# Altium PCB SBC_PCB.PcbDoc (part 2 of 4)
Units mm, origin at the board's own origin, x right, y up, seen from the top; angles counter-clockwise.
Board outline 85 x 56 mm, 8 copper layers (L1(SIG), L2(GND), L3(PWR), L4(SIG), L5(GND), L6(SIG), L7(GND), L8(SIG)), stack 1.593 mm thick; 597 components, 497 nets, 2394 pads, 229 vias.
Unrouted connection lines stored in the file: 1459.
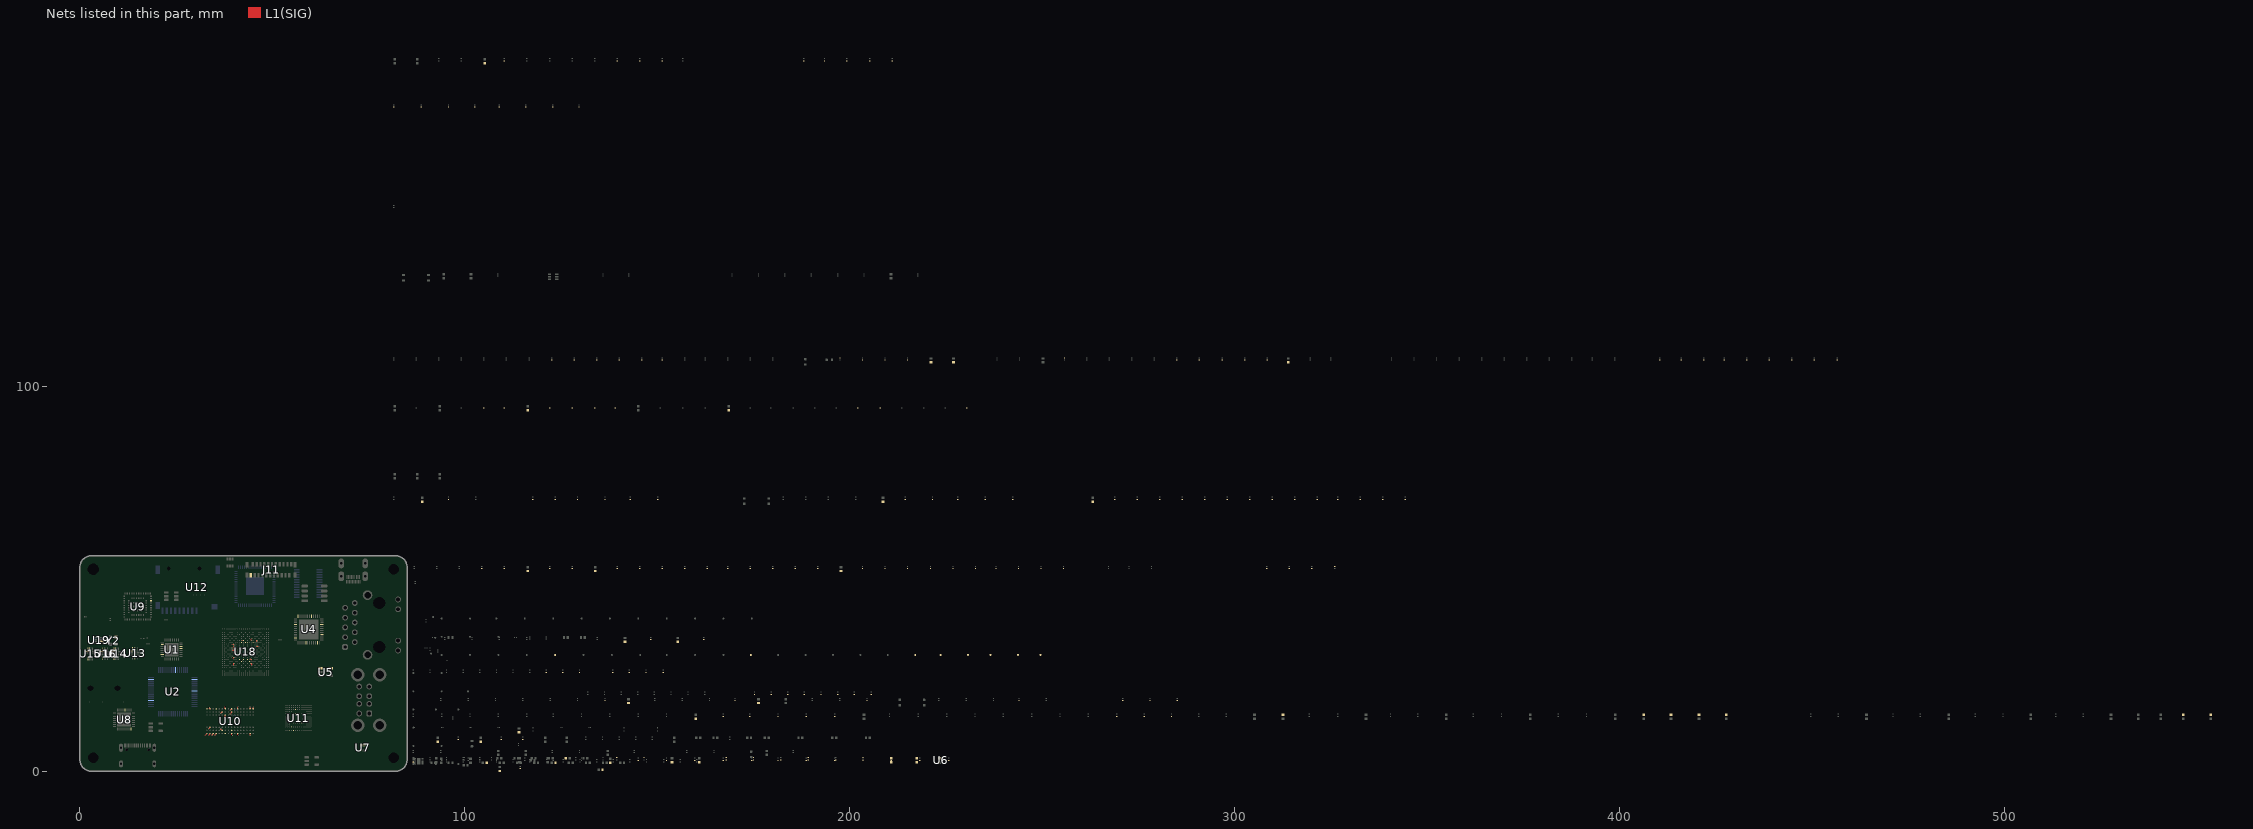
[diagram p3: the nets of this part, all layers, seen from the top]

## Footprints (in the part's own frame and the unit in brackets; to place one, negate y for a bottom-side part, rotate by r counter-clockwise, add the part's x,y. Pads: shape width x height; smd on the part's side, far side on the other; paste and mask are expansions set on the pad) (continued)
AM6254ATCGHAALW [mm]
  round 0.25 smd mask+0.05: A1(-6,6) A2(-5.5,6) A3(-5,6) A4(-4.5,6) A5(-4,6) A6(-3.5,6) A7(-3,6) A8(-2.5,6) A9(-2,6) A10(-1.5,6) A11(-1,6) A12(-0.5,6) A13(0,6) A14(0.5,6) A15(1,6) A16(1.5,6) A17(2,6) A18(2.5,6) A19(3,6) A20(3.5,6) A21(4,6) A22(4.5,6) A23(5,6) A24(5.5,6) A25(6,6) AA1(-6,-4) AA2(-5.5,-4) AA3(-5,-4) AA5(-4,-4) AA7(-3,-4) AA8(-2.5,-4) AA11(-1,-4) AA12(-0.5,-4) AA14(0.5,-4) AA15(1,-4) AA18(2.5,-4) AA19(3,-4) AA21(4,-4) AA23(5,-4) AA24(5.5,-4) AA25(6,-4) AB1(-6,-4.5) AB2(-5.5,-4.5) AB4(-4.5,-4.5) AB6(-3.5,-4.5) AB9(-2,-4.5) AB10(-1.5,-4.5) AB12(-0.5,-4.5) AB14(0.5,-4.5) AB16(1.5,-4.5) AB17(2,-4.5) AB20(3.5,-4.5) AB22(4.5,-4.5) AB24(5.5,-4.5) AB25(6,-4.5) AC1(-6,-5) AC2(-5.5,-5) AC5(-4,-5) AC6(-3.5,-5) AC9(-2,-5) AC11(-1,-5) AC13(0,-5) AC15(1,-5) AC17(2,-5) AC20(3.5,-5) AC21(4,-5) AC24(5.5,-5) AC25(6,-5) AD1(-6,-5.5) AD2(-5.5,-5.5) AD3(-5,-5.5) AD4(-4.5,-5.5) AD5(-4,-5.5) AD6(-3.5,-5.5) AD7(-3,-5.5) AD8(-2.5,-5.5) AD9(-2,-5.5) AD10(-1.5,-5.5) AD11(-1,-5.5) AD12(-0.5,-5.5) AD13(0,-5.5) AD14(0.5,-5.5) AD15(1,-5.5) AD16(1.5,-5.5) AD17(2,-5.5) AD18(2.5,-5.5) AD19(3,-5.5) AD20(3.5,-5.5) AD21(4,-5.5) AD22(4.5,-5.5) AD23(5,-5.5) AD24(5.5,-5.5) AD25(6,-5.5) AE1(-6,-6) AE2(-5.5,-6) AE3(-5,-6) AE4(-4.5,-6) AE5(-4,-6) AE6(-3.5,-6) AE7(-3,-6) AE8(-2.5,-6) AE9(-2,-6) AE10(-1.5,-6) AE11(-1,-6) AE12(-0.5,-6) AE13(0,-6) AE14(0.5,-6) AE15(1,-6) AE16(1.5,-6) AE17(2,-6) AE18(2.5,-6) AE19(3,-6) AE20(3.5,-6) AE21(4,-6) AE22(4.5,-6) AE23(5,-6) AE24(5.5,-6) AE25(6,-6) B1(-6,5.5) B2(-5.5,5.5) B3(-5,5.5) B4(-4.5,5.5) B5(-4,5.5) B6(-3.5,5.5) B7(-3,5.5) B8(-2.5,5.5) B9(-2,5.5) B10(-1.5,5.5) B11(-1,5.5) B12(-0.5,5.5) B13(0,5.5) B14(0.5,5.5) B15(1,5.5) B16(1.5,5.5) B17(2,5.5) B18(2.5,5.5) B19(3,5.5) B20(3.5,5.5) B21(4,5.5) B22(4.5,5.5) B23(5,5.5) B24(5.5,5.5) B25(6,5.5) C1(-6,5) C2(-5.5,5) C5(-4,5) C6(-3.5,5) C9(-2,5) C11(-1,5) C13(0,5) C15(1,5) C17(2,5) C20(3.5,5) C21(4,5) C24(5.5,5) C25(6,5) D1(-6,4.5) D2(-5.5,4.5) D4(-4.5,4.5) D6(-3.5,4.5) D9(-2,4.5) D10(-1.5,4.5) D12(-0.5,4.5) D14(0.5,4.5) D16(1.5,4.5) D17(2,4.5) D20(3.5,4.5) D22(4.5,4.5) D24(5.5,4.5) D25(6,4.5) E1(-6,4) E2(-5.5,4) E3(-5,4) E5(-4,4) E7(-3,4) E8(-2.5,4) E11(-1,4) E12(-0.5,4) E14(0.5,4) E15(1,4) E18(2.5,4) E19(3,4) E21(4,4) E23(5,4) E24(5.5,4) E25(6,4) F1(-6,3.5) F2(-5.5,3.5) F3(-5,3.5) F4(-4.5,3.5) F6(-3.5,3.5) F8(-2.5,3.5) F11(-1,3.5) F13(0,3.5) F15(1,3.5) F18(2.5,3.5) F20(3.5,3.5) F22(4.5,3.5) F23(5,3.5) F24(5.5,3.5) F25(6,3.5) G1(-6,3) G2(-5.5,3) G5(-4,3) G7(-3,3) G9(-2,3) G10(-1.5,3) G12(-0.5,3) G13(0,3) G14(0.5,3) G16(1.5,3) G17(2,3) G19(3,3) G21(4,3) G24(5.5,3) G25(6,3) H1(-6,2.5) H2(-5.5,2.5) H5(-4,2.5) H6(-3.5,2.5) H8(-2.5,2.5) H9(-2,2.5) H10(-1.5,2.5) H11(-1,2.5) H13(0,2.5) H15(1,2.5) H16(1.5,2.5) H17(2,2.5) H18(2.5,2.5) H20(3.5,2.5) H21(4,2.5) H24(5.5,2.5) H25(6,2.5) J1(-6,2) J2(-5.5,2) J3(-5,2) J4(-4.5,2) J7(-3,2) J8(-2.5,2) J11(-1,2) J12(-0.5,2) J13(0,2) J14(0.5,2) J18(2.5,2) J19(3,2) J22(4.5,2) J23(5,2) J24(5.5,2) J25(6,2) K1(-6,1.5) K2(-5.5,1.5) K3(-5,1.5) K4(-4.5,1.5) K7(-3,1.5) K9(-2,1.5) K10(-1.5,1.5) K13(0,1.5) K15(1,1.5) K16(1.5,1.5) K17(2,1.5) K18(2.5,1.5) K19(3,1.5) K22(4.5,1.5) K24(5.5,1.5) K25(6,1.5) L1(-6,1) L2(-5.5,1) L5(-4,1) L6(-3.5,1) L8(-2.5,1) L11(-1,1) L12(-0.5,1) L14(0.5,1) L15(1,1) L18(2.5,1) L20(3.5,1) L21(4,1) L23(5,1) L24(5.5,1) L25(6,1) M1(-6,0.5) M2(-5.5,0.5) M4(-4.5,0.5) M5(-4,0.5) M7(-3,0.5) M8(-2.5,0.5) M9(-2,0.5) M10(-1.5,0.5) M12(-0.5,0.5) M13(0,0.5) M16(1.5,0.5) M17(2,0.5) M18(2.5,0.5) M19(3,0.5) M21(4,0.5) M22(4.5,0.5) M24(5.5,0.5) M25(6,0.5) N1(-6,0) N2(-5.5,0) N3(-5,0) N6(-3.5,0) N8(-2.5,0) N11(-1,0) N12(-0.5,0) N13(0,0) N14(0.5,0) N15(1,0) N18(2.5,0) N20(3.5,0) N23(5,0) N24(5.5,0) N25(6,0) P1(-6,-0.5) P2(-5.5,-0.5) P4(-4.5,-0.5) P5(-4,-0.5) P7(-3,-0.5) P9(-2,-0.5) P10(-1.5,-0.5) P13(0,-0.5) P16(1.5,-0.5) P17(2,-0.5) P18(2.5,-0.5) P19(3,-0.5) P21(4,-0.5) P22(4.5,-0.5) P24(5.5,-0.5) P25(6,-0.5) R1(-6,-1) R2(-5.5,-1) R3(-5,-1) R5(-4,-1) R6(-3.5,-1) R8(-2.5,-1) R11(-1,-1) R12(-0.5,-1) R13(0,-1) R14(0.5,-1) R15(1,-1) R18(2.5,-1) R20(3.5,-1) R21(4,-1) R23(5,-1) R24(5.5,-1) R25(6,-1) T1(-6,-1.5) T2(-5.5,-1.5) T4(-4.5,-1.5) T7(-3,-1.5) T8(-2.5,-1.5) T9(-2,-1.5) T10(-1.5,-1.5) T13(0,-1.5) T14(0.5,-1.5) T16(1.5,-1.5) T17(2,-1.5) T18(2.5,-1.5) T19(3,-1.5) T22(4.5,-1.5) T24(5.5,-1.5) T25(6,-1.5) U1(-6,-2) U2(-5.5,-2) U3(-5,-2) U4(-4.5,-2) U7(-3,-2) U8(-2.5,-2) U11(-1,-2) U12(-0.5,-2) U14(0.5,-2) U15(1,-2) U18(2.5,-2) U19(3,-2) U22(4.5,-2) U23(5,-2) U24(5.5,-2) U25(6,-2) V1(-6,-2.5) V2(-5.5,-2.5) V5(-4,-2.5) V6(-3.5,-2.5) V8(-2.5,-2.5) V9(-2,-2.5) V10(-1.5,-2.5) V11(-1,-2.5) V13(0,-2.5) V15(1,-2.5) V16(1.5,-2.5) V17(2,-2.5) V18(2.5,-2.5) V20(3.5,-2.5) V21(4,-2.5) V24(5.5,-2.5) V25(6,-2.5) W1(-6,-3) W2(-5.5,-3) W5(-4,-3) W7(-3,-3) W9(-2,-3) W10(-1.5,-3) W12(-0.5,-3) W13(0,-3) W14(0.5,-3) W16(1.5,-3) W17(2,-3) W19(3,-3) W21(4,-3) W24(5.5,-3) W25(6,-3) Y1(-6,-3.5) Y2(-5.5,-3.5) Y3(-5,-3.5) Y4(-4.5,-3.5) Y6(-3.5,-3.5) Y8(-2.5,-3.5) Y11(-1,-3.5) Y13(0,-3.5) Y15(1,-3.5) Y18(2.5,-3.5) Y20(3.5,-3.5) Y22(4.5,-3.5) Y23(5,-3.5) Y24(5.5,-3.5) Y25(6,-3.5)
  silkscreen extent -7.1,-6.5 6.5,6.5, body extent -6.5,-6.5 6.5,6.5, height 0.89
C0201 [mm]
  rect 0.25x0.35 smd: 1(-0.275,0) 2(0.275,0)
  body extent -0.3,-0.15 0.3,0.15, height 0.3
C0402 [mm]
  rect 0.6x0.7 smd: 1(-0.5,0) 2(0.5,0)
  body extent -0.5,-0.25 0.5,0.25, height 0.5
COAXIAL-SWG [mil]
  round 1 smd mask+4: 1(0,37.4) 3(0,-37.4)
  round 1 smd mask+0: 2(-31.5,0) 4(31.5,0)
  round 1 on Top Solder: 3(0,28.94) 3(0,-28.94)
  L1(SIG) region: -45.28,-21.65 -26.77,-21.65 -17.72,-12.6 -17.72,12.6 -26.77,21.65 -45.28,21.65
  L1(SIG) region: 17.72,-12.6 26.77,-21.65 45.28,-21.65 45.28,21.65 26.77,21.65 17.72,12.6
  L1(SIG) region: -9.84,29.53 -9.84,45.28 9.84,45.28 9.84,29.53
  L1(SIG) region: -9.84,-45.28 9.84,-45.28 9.84,-29.53 -9.84,-29.53
  body extent -39,-41 39,41, height 36
D_SOD-523 [mm] "http://www.diodes.com/datasheets/ap02001.pdf p.144"
  rrect50% 0.6x0.7 smd: 1(-0.7,0) 2(0.7,0)
  silkscreen extent -1.26,-0.6 0.7,0.6, body extent -0.8,-0.4 0.8,0.4, height 0.63
D_SOD-923 [mm] "https://www.onsemi.com/pub/Collateral/ESD9B-D.PDF#page=4"
  rrect50% 0.36x0.25 smd: 1(-0.42,0) 2(0.42,0)
  silkscreen extent -0.86,-0.4 0.5,0.4, body extent -0.5,-0.3 0.5,0.3, height 0.37
ESD341 [mm]
  rrect30% 0.3x0.23 smd: 1(0,0.175) 2(0,-0.175)
  body extent -0.15,-0.3 0.15,0.3, height 0.3
FB0201 [mm]
  rect 0.25x0.35 smd: 1(-0.275,0) 2(0.275,0)
  body extent -0.3,-0.15 0.3,0.15, height 0.3
FB0402 [mm]
  rect 0.6x0.7 smd: 1(-0.5,0) 2(0.5,0)
  body extent -0.5,-0.25 0.5,0.25, height 0.5
FBGA-96_8X14MM_LAYOUT9X16_P0.8MM [mm] "FBGA-96, 8.0x14.0mm, 96 Ball, 9x16 Layout, 0.8mm Pitch, generalized from https://www.micron.com/-/media/client/global/documents/products/data-sheet/dram/ddr3/4gb_ddr3l.pdf#page=28"
  round 0.36 smd: A1(-3.2,6) A2(-2.4,6) A3(-1.6,6) A7(1.6,6) A8(2.4,6) A9(3.2,6) B1(-3.2,5.2) B2(-2.4,5.2) B3(-1.6,5.2) B7(1.6,5.2) B8(2.4,5.2) B9(3.2,5.2) C1(-3.2,4.4) C2(-2.4,4.4) C3(-1.6,4.4) C7(1.6,4.4) C8(2.4,4.4) C9(3.2,4.4) D1(-3.2,3.6) D2(-2.4,3.6) D3(-1.6,3.6) D7(1.6,3.6) D8(2.4,3.6) D9(3.2,3.6) E1(-3.2,2.8) E2(-2.4,2.8) E3(-1.6,2.8) E7(1.6,2.8) E8(2.4,2.8) E9(3.2,2.8) F1(-3.2,2) F2(-2.4,2) F3(-1.6,2) F7(1.6,2) F8(2.4,2) F9(3.2,2) G1(-3.2,1.2) G2(-2.4,1.2) G3(-1.6,1.2) G7(1.6,1.2) G8(2.4,1.2) G9(3.2,1.2) H1(-3.2,0.4) H2(-2.4,0.4) H3(-1.6,0.4) H7(1.6,0.4) H8(2.4,0.4) H9(3.2,0.4) J1(-3.2,-0.4) J2(-2.4,-0.4) J3(-1.6,-0.4) J7(1.6,-0.4) J8(2.4,-0.4) J9(3.2,-0.4) K1(-3.2,-1.2) K2(-2.4,-1.2) K3(-1.6,-1.2) K7(1.6,-1.2) K8(2.4,-1.2) K9(3.2,-1.2) L1(-3.2,-2) L2(-2.4,-2) L3(-1.6,-2) L7(1.6,-2) L8(2.4,-2) L9(3.2,-2) M1(-3.2,-2.8) M2(-2.4,-2.8) M3(-1.6,-2.8) M7(1.6,-2.8) M8(2.4,-2.8) M9(3.2,-2.8) N1(-3.2,-3.6) N2(-2.4,-3.6) N3(-1.6,-3.6) N7(1.6,-3.6) N8(2.4,-3.6) N9(3.2,-3.6) P1(-3.2,-4.4) P2(-2.4,-4.4) P3(-1.6,-4.4) P7(1.6,-4.4) P8(2.4,-4.4) P9(3.2,-4.4) R1(-3.2,-5.2) R2(-2.4,-5.2) R3(-1.6,-5.2) R7(1.6,-5.2) R8(2.4,-5.2) R9(3.2,-5.2) T1(-3.2,-6) T2(-2.4,-6) T3(-1.6,-6) T7(1.6,-6) T8(2.4,-6) T9(3.2,-6)
  silkscreen extent -5.88,6.86 -5.38,7.36, body extent -5.15,-6.65 5.15,6.65, height 1.1
HDMI_Micro-D_Molex_46765-1xxx [mm] "HDMI, Micro, Type D, THT, 0.4mm pitch, 19 ckt, right angle (http://www.molex.com/pdm_docs/sd/467651301_sd.pdf)"
  rect 0.23x0.85 smd: 1(1.8,4.775) 3(1.4,4.775) 5(1,4.775) 7(0.6,4.775) 9(0.2,4.775) 11(-0.2,4.775) 13(-0.6,4.775) 15(-1,4.775) 17(-1.4,4.775) 19(-1.8,4.775)
  rect 0.23x1 smd: 2(1.6,3.55) 4(1.2,3.55) 6(0.8,3.55) 8(0.4,3.55) 10(0,3.55) 12(-0.4,3.55) 14(-0.8,3.55) 16(-1.2,3.55) 18(-1.6,3.55)
  oval 1.5x2.55 hole 0.65 slot 1.7 at 90 deg: SH(-3.1,3.36) SH(-3.1,0) SH(3.1,3.36) SH(3.1,0)
  silkscreen extent -3.31,-2.46 3.31,5.36, body extent -3.25,-2.4 3.25,5.1, height 2.9
HR911130A [mm]
  rrect50% 1.5x1.5 hole 0.89: 1(5.716,-9.09)
  round 1.5 hole 0.89: 2(4.446,-6.55) 3(3.176,-9.09) 4(1.906,-6.55) 5(0.636,-9.09) 6(-0.634,-6.55) 7(-1.904,-9.09) 8(-3.174,-6.55) 9(-4.444,-9.09) 10(-5.714,-6.55)
  round 1.5 hole 1.02: 11(6.625,4.7) 12(4.085,4.7) 13(-4.085,4.7) 14(-6.625,4.7)
  round 0 hole 3.2 unplated: M1(-5.712,-0.2) M2(5.718,-0.2)
  round 2.5 hole 1.7: S1(-7.745,-3.25) S2(7.745,-3.25)
  body extent -8.01,-10.7 7.87,10.7, height 13.51
IS25WP128-RHLE [mil]
  round 1 smd: A2(-39.36,78.74) A3(0.01,78.74) A4(39.38,78.74) A5(78.75,78.74) B1(-78.73,39.37) B2(-39.36,39.37) B3(0.01,39.37) B4(39.38,39.37) B5(78.75,39.37) C(78.75,0) C1(-78.73,0) C2(-39.36,0) C3(0.01,0) C4(39.38,0) D1(-78.73,-39.37) D2(-39.36,-39.37) D3(0.01,-39.37) D4(39.38,-39.37) D5(78.75,-39.37) E1(-78.73,-78.74) E2(-39.36,-78.74) E3(0.01,-78.74) E4(39.38,-78.74) E5(78.75,-78.74)
  L1(SIG) region: -39.37,70.87 -42.38,71.47 -44.94,73.17 -46.64,75.73 -47.24,78.74 -47.24,78.74 -46.64,81.75 -44.94,84.31 -42.38,86.01 -39.37,86.61 -39.37,86.61 -36.36,86.01 -33.8,84.31 -32.1,81.75 -31.5,78.74 -31.5,78.74 -32.1,75.73 -33.8,73.17 -36.36,71.47 -39.37,70.87
  L1(SIG) region: 0,70.87 -3.01,71.47 -5.57,73.17 -7.27,75.73 -7.87,78.74 -7.87,78.74 -7.27,81.75 -5.57,84.31 -3.01,86.01 0,86.61 0,86.61 3.01,86.01 5.57,84.31 7.27,81.75 7.87,78.74 7.87,78.74 7.27,75.73 5.57,73.17 3.01,71.47 0,70.87
  L1(SIG) region: 39.37,70.87 36.36,71.47 33.8,73.17 32.1,75.73 31.5,78.74 31.5,78.74 32.1,81.75 33.8,84.31 36.36,86.01 39.37,86.61 39.37,86.61 42.38,86.01 44.94,84.31 46.64,81.75 47.24,78.74 47.24,78.74 46.64,75.73 44.94,73.17 42.38,71.47 39.37,70.87
  L1(SIG) region: 78.74,70.87 75.73,71.47 73.17,73.17 71.47,75.73 70.87,78.74 70.87,78.74 71.47,81.75 73.17,84.31 75.73,86.01 78.74,86.61 78.74,86.61 81.75,86.01 84.31,84.31 86.01,81.75 86.61,78.74 86.61,78.74 86.01,75.73 84.31,73.17 81.75,71.47 78.74,70.87
  L1(SIG) region: -78.74,31.5 -81.75,32.1 -84.31,33.8 -86.01,36.36 -86.61,39.37 -86.61,39.37 -86.01,42.38 -84.31,44.94 -81.75,46.64 -78.74,47.24 -78.74,47.24 -75.73,46.64 -73.17,44.94 -71.47,42.38 -70.87,39.37 -70.87,39.37 -71.47,36.36 -73.17,33.8 -75.73,32.1 -78.74,31.5
  L1(SIG) region: -39.37,31.5 -42.38,32.1 -44.94,33.8 -46.64,36.36 -47.24,39.37 -47.24,39.37 -46.64,42.38 -44.94,44.94 -42.38,46.64 -39.37,47.24 -39.37,47.24 -36.36,46.64 -33.8,44.94 -32.1,42.38 -31.5,39.37 -31.5,39.37 -32.1,36.36 -33.8,33.8 -36.36,32.1 -39.37,31.5
  L1(SIG) region: 39.37,31.5 36.36,32.1 33.8,33.8 32.1,36.36 31.5,39.37 31.5,39.37 32.1,42.38 33.8,44.94 36.36,46.64 39.37,47.24 39.37,47.24 42.38,46.64 44.94,44.94 46.64,42.38 47.24,39.37 47.24,39.37 46.64,36.36 44.94,33.8 42.38,32.1 39.37,31.5
  L1(SIG) region: 70.87,39.37 71.47,36.36 73.17,33.8 75.73,32.1 78.74,31.5 78.74,31.5 81.75,32.1 84.31,33.8 86.01,36.36 86.61,39.37 86.61,39.37 86.01,42.38 84.31,44.94 81.75,46.64 78.74,47.24 78.74,47.24 75.73,46.64 73.17,44.94 71.47,42.38 70.87,39.37
  L1(SIG) region: -78.74,-7.87 -81.75,-7.27 -84.31,-5.57 -86.01,-3.01 -86.61,0 -86.61,0 -86.01,3.01 -84.31,5.57 -81.75,7.27 -78.74,7.87 -78.74,7.87 -75.73,7.27 -73.17,5.57 -71.47,3.01 -70.87,0 -70.87,0 -71.47,-3.01 -73.17,-5.57 -75.73,-7.27 -78.74,-7.87
  L1(SIG) region: -39.37,-7.87 -42.38,-7.27 -44.94,-5.57 -46.64,-3.01 -47.24,0 -47.24,0 -46.64,3.01 -44.94,5.57 -42.38,7.27 -39.37,7.87 -39.37,7.87 -36.36,7.27 -33.8,5.57 -32.1,3.01 -31.5,0 -31.5,0 -32.1,-3.01 -33.8,-5.57 -36.36,-7.27 -39.37,-7.87
  L1(SIG) region: 0,-7.87 -3.01,-7.27 -5.57,-5.57 -7.27,-3.01 -7.87,0 -7.87,0 -7.27,3.01 -5.57,5.57 -3.01,7.27 0,7.87 0,7.87 3.01,7.27 5.57,5.57 7.27,3.01 7.87,0 7.87,0 7.27,-3.01 5.57,-5.57 3.01,-7.27 0,-7.87
  L1(SIG) region: 31.5,0 32.1,-3.01 33.8,-5.57 36.36,-7.27 39.37,-7.87 39.37,-7.87 42.38,-7.27 44.94,-5.57 46.64,-3.01 47.24,0 47.24,0 46.64,3.01 44.94,5.57 42.38,7.27 39.37,7.87 39.37,7.87 36.36,7.27 33.8,5.57 32.1,3.01 31.5,0
  L1(SIG) region: 70.87,0 71.47,-3.01 73.17,-5.57 75.73,-7.27 78.74,-7.87 78.74,-7.87 81.75,-7.27 84.31,-5.57 86.01,-3.01 86.61,0 86.61,0 86.01,3.01 84.31,5.57 81.75,7.27 78.74,7.87 78.74,7.87 75.73,7.27 73.17,5.57 71.47,3.01 70.87,0
  L1(SIG) region: -78.74,-47.24 -81.75,-46.64 -84.31,-44.94 -86.01,-42.38 -86.61,-39.37 -86.61,-39.37 -86.01,-36.36 -84.31,-33.8 -81.75,-32.1 -78.74,-31.5 -78.74,-31.5 -75.73,-32.1 -73.17,-33.8 -71.47,-36.36 -70.87,-39.37 -70.87,-39.37 -71.47,-42.38 -73.17,-44.94 -75.73,-46.64 -78.74,-47.24
  L1(SIG) region: -39.37,-47.24 -42.38,-46.64 -44.94,-44.94 -46.64,-42.38 -47.24,-39.37 -47.24,-39.37 -46.64,-36.36 -44.94,-33.8 -42.38,-32.1 -39.37,-31.5 -39.37,-31.5 -36.36,-32.1 -33.8,-33.8 -32.1,-36.36 -31.5,-39.37 -31.5,-39.37 -32.1,-42.38 -33.8,-44.94 -36.36,-46.64 -39.37,-47.24
  L1(SIG) region: -7.87,-39.37 -7.27,-42.38 -5.57,-44.94 -3.01,-46.64 0,-47.24 0,-47.24 3.01,-46.64 5.57,-44.94 7.27,-42.38 7.87,-39.37 7.87,-39.37 7.27,-36.36 5.57,-33.8 3.01,-32.1 0,-31.5 0,-31.5 -3.01,-32.1 -5.57,-33.8 -7.27,-36.36 -7.87,-39.37
  L1(SIG) region: 31.5,-39.37 32.1,-42.38 33.8,-44.94 36.36,-46.64 39.37,-47.24 39.37,-47.24 42.38,-46.64 44.94,-44.94 46.64,-42.38 47.24,-39.37 47.24,-39.37 46.64,-36.36 44.94,-33.8 42.38,-32.1 39.37,-31.5 39.37,-31.5 36.36,-32.1 33.8,-33.8 32.1,-36.36 31.5,-39.37
  L1(SIG) region: 70.87,-39.37 71.47,-42.38 73.17,-44.94 75.73,-46.64 78.74,-47.24 78.74,-47.24 81.75,-46.64 84.31,-44.94 86.01,-42.38 86.61,-39.37 86.61,-39.37 86.01,-36.36 84.31,-33.8 81.75,-32.1 78.74,-31.5 78.74,-31.5 75.73,-32.1 73.17,-33.8 71.47,-36.36 70.87,-39.37
  L1(SIG) region: -78.74,-86.61 -81.75,-86.01 -84.31,-84.31 -86.01,-81.75 -86.61,-78.74 -86.61,-78.74 -86.01,-75.73 -84.31,-73.17 -81.75,-71.47 -78.74,-70.87 -78.74,-70.87 -75.73,-71.47 -73.17,-73.17 -71.47,-75.73 -70.87,-78.74 -70.87,-78.74 -71.47,-81.75 -73.17,-84.31 -75.73,-86.01 -78.74,-86.61
  L1(SIG) region: -47.24,-78.74 -46.64,-81.75 -44.94,-84.31 -42.38,-86.01 -39.37,-86.61 -39.37,-86.61 -36.36,-86.01 -33.8,-84.31 -32.1,-81.75 -31.5,-78.74 -31.5,-78.74 -32.1,-75.73 -33.8,-73.17 -36.36,-71.47 -39.37,-70.87 -39.37,-70.87 -42.38,-71.47 -44.94,-73.17 -46.64,-75.73 -47.24,-78.74
  L1(SIG) region: -7.87,-78.74 -7.27,-81.75 -5.57,-84.31 -3.01,-86.01 0,-86.61 0,-86.61 3.01,-86.01 5.57,-84.31 7.27,-81.75 7.87,-78.74 7.87,-78.74 7.27,-75.73 5.57,-73.17 3.01,-71.47 0,-70.87 0,-70.87 -3.01,-71.47 -5.57,-73.17 -7.27,-75.73 -7.87,-78.74
  L1(SIG) region: 31.5,-78.74 32.1,-81.75 33.8,-84.31 36.36,-86.01 39.37,-86.61 39.37,-86.61 42.38,-86.01 44.94,-84.31 46.64,-81.75 47.24,-78.74 47.24,-78.74 46.64,-75.73 44.94,-73.17 42.38,-71.47 39.37,-70.87 39.37,-70.87 36.36,-71.47 33.8,-73.17 32.1,-75.73 31.5,-78.74
  L1(SIG) region: 70.87,-78.74 71.47,-81.75 73.17,-84.31 75.73,-86.01 78.74,-86.61 78.74,-86.61 81.75,-86.01 84.31,-84.31 86.01,-81.75 86.61,-78.74 86.61,-78.74 86.01,-75.73 84.31,-73.17 81.75,-71.47 78.74,-70.87 78.74,-70.87 75.73,-71.47 73.17,-73.17 71.47,-75.73 70.87,-78.74
  L1(SIG) region: 0,31.5 -3.01,32.1 -5.57,33.8 -7.27,36.36 -7.87,39.37 -7.87,39.37 -7.27,42.38 -5.57,44.94 -3.01,46.64 0,47.24 0,47.24 3.01,46.64 5.57,44.94 7.27,42.38 7.87,39.37 7.87,39.37 7.27,36.36 5.57,33.8 3.01,32.1 0,31.5
  silkscreen extent -135,125 -125,145, body extent -118,-157 118,157, height 47
LBEE5PK2AE-564 [mm]
  rect 0.3x0.45 smd: 1(-3.3,-3.375) 2(-2.7,-3.375) 3(-2.1,-3.375) 4(-1.5,-3.375) 5(-0.9,-3.375) 6(-0.3,-3.375) 7(0.3,-3.375) 8(0.9,-3.375) 9(1.5,-3.375) 10(2.1,-3.375) 11(2.7,-3.375) 12(3.3,-3.375) 23(3.3,3.375) 24(2.7,3.375) 25(2.1,3.375) 26(1.5,3.375) 27(0.9,3.375) 28(0.3,3.375) 29(-0.3,3.375) 30(-0.9,3.375) 31(-1.5,3.375) 32(-2.1,3.375) 33(-2.7,3.375) 34(-3.3,3.375) 45(-1.5,-2.175) 46(-0.9,-2.175) 47(-0.3,-2.175) 48(0.3,-2.175) 49(0.9,-2.175) 50(1.5,-2.175) 57(1.5,2.175) 58(0.9,2.175) 59(0.3,2.175) 60(-0.3,2.175) 61(-0.9,2.175) 62(-1.5,2.175) 69(-1,-1) 70(0,-1) 71(1,-1) 72(1,0) 73(1,1) 74(0,1) 75(-1,1) 76(-1,0) 77(0,0)
  rect 0.45x0.3 smd: 13(3.475,-2.7) 14(3.475,-2.1) 15(3.475,-1.5) 16(3.475,-0.9) 17(3.475,-0.3) 18(3.475,0.3) 19(3.475,0.9) 20(3.475,1.5) 21(3.475,2.1) 22(3.475,2.7) 35(-3.475,2.7) 36(-3.475,2.1) 37(-3.475,1.5) 38(-3.475,0.9) 39(-3.475,0.3) 40(-3.475,-0.3) 41(-3.475,-0.9) 42(-3.475,-1.5) 43(-3.475,-2.1) 44(-3.475,-2.7) 51(2.275,-1.5) 52(2.275,-0.9) 53(2.275,-0.3) 54(2.275,0.3) 55(2.275,0.9) 56(2.275,1.5) 63(-2.275,1.5) 64(-2.275,0.9) 65(-2.275,0.3) 66(-2.275,-0.3) 67(-2.275,-0.9) 68(-2.275,-1.5)
  silkscreen extent -4.32,-3.68 -4.06,-3.18, body extent -4,-3.9 4,3.9, height 1.19
LFBGA-153_11.5X13MM_LAYOUT14X14_P0.5MM [mm] "JEDEC eMMC AN BGA-153, 11.5x13.0mm, 153 Ball, 14x14 Layout, 0.5mm Pitch, https://www.jedec.org/sites/default/files/docs/MO-276F.pdf"
  round 0.24 smd: A1(-3.25,3.25) A2(-2.75,3.25) A3(-2.25,3.25) A4(-1.75,3.25) A5(-1.25,3.25) A6(-0.75,3.25) A7(-0.25,3.25) A8(0.25,3.25) A9(0.75,3.25) A10(1.25,3.25) A11(1.75,3.25) A12(2.25,3.25) A13(2.75,3.25) A14(3.25,3.25) B1(-3.25,2.75) B2(-2.75,2.75) B3(-2.25,2.75) B4(-1.75,2.75) B5(-1.25,2.75) B6(-0.75,2.75) B7(-0.25,2.75) B8(0.25,2.75) B9(0.75,2.75) B10(1.25,2.75) B11(1.75,2.75) B12(2.25,2.75) B13(2.75,2.75) B14(3.25,2.75) C1(-3.25,2.25) C2(-2.75,2.25) C3(-2.25,2.25) C4(-1.75,2.25) C5(-1.25,2.25) C6(-0.75,2.25) C7(-0.25,2.25) C8(0.25,2.25) C9(0.75,2.25) C10(1.25,2.25) C11(1.75,2.25) C12(2.25,2.25) C13(2.75,2.25) C14(3.25,2.25) D1(-3.25,1.75) D2(-2.75,1.75) D3(-2.25,1.75) D4(-1.75,1.75) D12(2.25,1.75) D13(2.75,1.75) D14(3.25,1.75) E1(-3.25,1.25) E2(-2.75,1.25) E3(-2.25,1.25) E5(-1.25,1.25) E6(-0.75,1.25) E7(-0.25,1.25) E8(0.25,1.25) E9(0.75,1.25) E10(1.25,1.25) E12(2.25,1.25) E13(2.75,1.25) E14(3.25,1.25) F1(-3.25,0.75) F2(-2.75,0.75) F3(-2.25,0.75) F5(-1.25,0.75) F10(1.25,0.75) F12(2.25,0.75) F13(2.75,0.75) F14(3.25,0.75) G1(-3.25,0.25) G2(-2.75,0.25) G3(-2.25,0.25) G5(-1.25,0.25) G10(1.25,0.25) G12(2.25,0.25) G13(2.75,0.25) G14(3.25,0.25) H1(-3.25,-0.25) H2(-2.75,-0.25) H3(-2.25,-0.25) H5(-1.25,-0.25) H10(1.25,-0.25) H12(2.25,-0.25) H13(2.75,-0.25) H14(3.25,-0.25) J1(-3.25,-0.75) J2(-2.75,-0.75) J3(-2.25,-0.75) J5(-1.25,-0.75) J10(1.25,-0.75) J12(2.25,-0.75) J13(2.75,-0.75) J14(3.25,-0.75) K1(-3.25,-1.25) K2(-2.75,-1.25) K3(-2.25,-1.25) K5(-1.25,-1.25) K6(-0.75,-1.25) K7(-0.25,-1.25) K8(0.25,-1.25) K9(0.75,-1.25) K10(1.25,-1.25) K12(2.25,-1.25) K13(2.75,-1.25) K14(3.25,-1.25) L1(-3.25,-1.75) L2(-2.75,-1.75) L3(-2.25,-1.75) L12(2.25,-1.75) L13(2.75,-1.75) L14(3.25,-1.75) M1(-3.25,-2.25) M2(-2.75,-2.25) M3(-2.25,-2.25) M4(-1.75,-2.25) M5(-1.25,-2.25) M6(-0.75,-2.25) M7(-0.25,-2.25) M8(0.25,-2.25) M9(0.75,-2.25) M10(1.25,-2.25) M11(1.75,-2.25) M12(2.25,-2.25) M13(2.75,-2.25) M14(3.25,-2.25) N1(-3.25,-2.75) N2(-2.75,-2.75) N3(-2.25,-2.75) N4(-1.75,-2.75) N5(-1.25,-2.75) N6(-0.75,-2.75) N7(-0.25,-2.75) N8(0.25,-2.75) N9(0.75,-2.75) N10(1.25,-2.75) N11(1.75,-2.75) N12(2.25,-2.75) N13(2.75,-2.75) N14(3.25,-2.75) P1(-3.25,-3.25) P2(-2.75,-3.25) P3(-2.25,-3.25) P4(-1.75,-3.25) P5(-1.25,-3.25) P6(-0.75,-3.25) P7(-0.25,-3.25) P8(0.25,-3.25) P9(0.75,-3.25) P10(1.25,-3.25) P11(1.75,-3.25) P12(2.25,-3.25) P13(2.75,-3.25) P14(3.25,-3.25)
  silkscreen extent -6.36,6.61 -5.86,7.11, body extent -5.75,-6.5 5.75,6.5, height 0.8
LQFP-64_10x10mm_P0.5mm [mm] "LQFP, 64 Pin (https://www.analog.com/media/en/technical-documentation/data-sheets/ad7606_7606-6_7606-4.pdf)"
  rrect50% 1.55x0.3 smd: 1(-5.675,3.75) 2(-5.675,3.25) 3(-5.675,2.75) 4(-5.675,2.25) 5(-5.675,1.75) 6(-5.675,1.25) 7(-5.675,0.75) 8(-5.675,0.25) 9(-5.675,-0.25) 10(-5.675,-0.75) 11(-5.675,-1.25) 12(-5.675,-1.75) 13(-5.675,-2.25) 14(-5.675,-2.75) 15(-5.675,-3.25) 16(-5.675,-3.75) 33(5.675,-3.75) 34(5.675,-3.25) 35(5.675,-2.75) 36(5.675,-2.25) 37(5.675,-1.75) 38(5.675,-1.25) 39(5.675,-0.75) 40(5.675,-0.25) 41(5.675,0.25) 42(5.675,0.75) 43(5.675,1.25) 44(5.675,1.75) 45(5.675,2.25) 46(5.675,2.75) 47(5.675,3.25) 48(5.675,3.75)
  rrect50% 0.3x1.55 smd: 17(-3.75,-5.675) 18(-3.25,-5.675) 19(-2.75,-5.675) 20(-2.25,-5.675) 21(-1.75,-5.675) 22(-1.25,-5.675) 23(-0.75,-5.675) 24(-0.25,-5.675) 25(0.25,-5.675) 26(0.75,-5.675) 27(1.25,-5.675) 28(1.75,-5.675) 29(2.25,-5.675) 30(2.75,-5.675) 31(3.25,-5.675) 32(3.75,-5.675) 49(3.75,5.675) 50(3.25,5.675) 51(2.75,5.675) 52(2.25,5.675) 53(1.75,5.675) 54(1.25,5.675) 55(0.75,5.675) 56(0.25,5.675) 57(-0.25,5.675) 58(-0.75,5.675) 59(-1.25,5.675) 60(-1.75,5.675) 61(-2.25,5.675) 62(-2.75,5.675) 63(-3.25,5.675) 64(-3.75,5.675)
  silkscreen extent -6.09,-5.11 5.11,5.11, body extent -6,-6 6,6, height 1.5
MSD-1-A [mm]
  rect 0.6x1.6 smd: 1(2.325,7.825) 2(1.225,7.825) 3(0.125,7.825) 4(-0.975,7.825) 5(-2.075,7.825) 6(-3.175,7.825) 7(-4.275,7.825) 8(-5.375,7.825) 9(-6.475,7.825)
  round 0 hole 1 unplated: 14(-4.874,-3.175) 15(3.126,-3.175)
  rect 1.2x2.2 smd: SH(-7.675,-2.775) SH(7.825,-2.775)
  rect 1.2x1.8 smd: SH(-7.675,6.525)
  rect 1.6x1.5 smd: SH(7.025,6.775)
  silkscreen extent 3.56,8.13 3.81,8.64, body extent -7.95,-7.3 8.2,7.75, height 1.86
OSCILLATOR_SMD_ECS_2520MV-XXX-XX-4PIN_2.5X2.0MM [mm] "Miniature Crystal Clock Oscillator ECS 2520MV series, https://www.ecsxtal.com/store/pdf/ECS-2520MV.pdf"
  rrect50% 0.8x0.9 smd: 1(-0.725,0.925) 2(-0.725,-0.925) 3(0.725,-0.925) 4(0.725,0.925)
  silkscreen extent -1.11,-1.36 1.11,1.56, body extent -1,-1.25 1,1.25, height 0.91
PJ-342 [mm]
  round 0.025 smd: 2(2.2,3.6) 3(9.5,3.6) 4(11.5,3.3) 5(2.2,-3.6) 6(5.5,-3.6) 7(11,-3.6)
  round 0 hole 1.5 unplated: 3(2.4,0) 5(9.4,0)
  L1(SIG) region: 1.45,2.6 2.95,2.6 2.95,4.6 1.45,4.6
  L1(SIG) region: 10.75,2 10.75,4.6 12.25,4.6 12.25,2
  L1(SIG) region: 8.75,2.6 8.75,4.6 10.25,4.6 10.25,2.6
  L1(SIG) region: 1.45,-4.6 1.45,-2.6 2.95,-2.6 2.95,-4.6
  L1(SIG) region: 4.75,-4.6 4.75,-2.6 6.25,-2.6 6.25,-4.6
  L1(SIG) region: 10.25,-4.6 11.75,-4.6 11.75,-2.6 10.25,-2.6
  body extent -2,-4.25 12.3,4.25, height 4.81
QFN-32-1EP_5X5MM_P0.5MM_EP3.7X3.7MM [mm] "QFN, 32 Pin (https://www.espressif.com/sites/default/files/documentation/0a-esp8285_datasheet_en.pdf)"
  rrect50% 0.8x0.25 smd: 1(-2.45,1.75) 2(-2.45,1.25) 3(-2.45,0.75) 4(-2.45,0.25) 5(-2.45,-0.25) 6(-2.45,-0.75) 7(-2.45,-1.25) 8(-2.45,-1.75) 17(2.45,-1.75) 18(2.45,-1.25) 19(2.45,-0.75) 20(2.45,-0.25) 21(2.45,0.25) 22(2.45,0.75) 23(2.45,1.25) 24(2.45,1.75)
  rrect50% 0.25x0.8 smd: 9(-1.75,-2.45) 10(-1.25,-2.45) 11(-0.75,-2.45) 12(-0.25,-2.45) 13(0.25,-2.45) 14(0.75,-2.45) 15(1.25,-2.45) 16(1.75,-2.45) 25(1.75,2.45) 26(1.25,2.45) 27(0.75,2.45) 28(0.25,2.45) 29(-0.25,2.45) 30(-0.75,2.45) 31(-1.25,2.45) 32(-1.75,2.45)
  rect 3.7x3.7 smd paste-1.85: 33(0,0)
  silkscreen extent -3.44,-2.61 2.61,2.61, body extent -2.5,-2.5 2.5,2.5, height 0.85
QFN-48-1EP_7X7MM_P0.5MM_EP5.15X5.15MM [mm] "QFN, 48 Pin (http://www.analog.com/media/en/package-pcb-resources/package/pkg_pdf/ltc-legacy-qfn/QFN_48_05-08-1704.pdf)"
  rrect50% 0.875x0.25 smd: 1(-3.437,2.75) 2(-3.437,2.25) 3(-3.438,1.75) 4(-3.438,1.25) 5(-3.437,0.75) 6(-3.437,0.25) 7(-3.437,-0.25) 8(-3.437,-0.75) 9(-3.438,-1.25) 10(-3.438,-1.75) 11(-3.437,-2.25) 12(-3.437,-2.75) 25(3.437,-2.75) 26(3.437,-2.25) 27(3.438,-1.75) 28(3.438,-1.25) 29(3.437,-0.75) 30(3.437,-0.25) 31(3.437,0.25) 32(3.437,0.75) 33(3.438,1.25) 34(3.438,1.75) 35(3.437,2.25) 36(3.437,2.75)
  rrect50% 0.25x0.875 smd: 13(-2.75,-3.437) 14(-2.25,-3.437) 15(-1.75,-3.438) 16(-1.25,-3.438) 17(-0.75,-3.437) 18(-0.25,-3.437) 19(0.25,-3.437) 20(0.75,-3.437) 21(1.25,-3.438) 22(1.75,-3.438) 23(2.25,-3.437) 24(2.75,-3.437) 37(2.75,3.437) 38(2.25,3.437) 39(1.75,3.438) 40(1.25,3.438) 41(0.75,3.437) 42(0.25,3.437) 43(-0.25,3.437) 44(-0.75,3.437) 45(-1.25,3.438) 46(-1.75,3.438) 47(-2.25,3.437) 48(-2.75,3.437)
  rect 5.15x5.15 smd paste-2.575: 49(0,0)
  silkscreen extent -4.47,-3.61 3.61,3.61, body extent -3.55,-3.55 3.55,3.55, height 1
QFN-72-1EP_10X10MM_P0.5MM_EP4.7X4.7MM [mm] "QFN, 72 Pin (http://ww1.microchip.com/downloads/en/DeviceDoc/00001682C.pdf#page=70)"
  rrect50% 0.875x0.25 smd: 1(-4.938,4.25) 2(-4.938,3.75) 3(-4.938,3.25) 4(-4.938,2.75) 5(-4.938,2.25) 6(-4.938,1.75) 7(-4.938,1.25) 8(-4.938,0.75) 9(-4.938,0.25) 10(-4.938,-0.25) 11(-4.938,-0.75) 12(-4.938,-1.25) 13(-4.938,-1.75) 14(-4.938,-2.25) 15(-4.938,-2.75) 16(-4.938,-3.25) 17(-4.938,-3.75) 18(-4.938,-4.25) 37(4.938,-4.25) 38(4.938,-3.75) 39(4.938,-3.25) 40(4.938,-2.75) 41(4.938,-2.25) 42(4.938,-1.75) 43(4.938,-1.25) 44(4.938,-0.75) 45(4.938,-0.25) 46(4.938,0.25) 47(4.938,0.75) 48(4.938,1.25) 49(4.938,1.75) 50(4.938,2.25) 51(4.938,2.75) 52(4.938,3.25) 53(4.938,3.75) 54(4.938,4.25)
  rrect50% 0.25x0.875 smd: 19(-4.25,-4.938) 20(-3.75,-4.938) 21(-3.25,-4.938) 22(-2.75,-4.938) 23(-2.25,-4.938) 24(-1.75,-4.938) 25(-1.25,-4.938) 26(-0.75,-4.938) 27(-0.25,-4.938) 28(0.25,-4.938) 29(0.75,-4.938) 30(1.25,-4.938) 31(1.75,-4.938) 32(2.25,-4.938) 33(2.75,-4.938) 34(3.25,-4.938) 35(3.75,-4.938) 36(4.25,-4.938) 55(4.25,4.938) 56(3.75,4.938) 57(3.25,4.938) 58(2.75,4.938) 59(2.25,4.938) 60(1.75,4.938) 61(1.25,4.938) 62(0.75,4.938) 63(0.25,4.938) 64(-0.25,4.938) 65(-0.75,4.938) 66(-1.25,4.938) 67(-1.75,4.938) 68(-2.25,4.938) 69(-2.75,4.938) 70(-3.25,4.938) 71(-3.75,4.938) 72(-4.25,4.938)
  rect 4.7x4.7 smd paste-3: 73(0,0)
  silkscreen extent -5.35,-5.11 5.11,5.44, body extent -5,-5 5,5, height 0.85
R0201 [mm]
  rect 0.25x0.35 smd: 1(-0.275,0) 2(0.275,0)
  body extent -0.3,-0.15 0.3,0.15, height 0.23
R0402 [mm]
  rect 0.6x0.7 smd: 1(-0.5,0) 2(0.5,0)
  body extent -0.5,-0.25 0.5,0.25, height 0.35
SOT563 [mm]
  rect 0.3x0.67 smd: 1(-0.5,-0.635) 2(0,-0.635) 3(0.5,-0.635) 4(0.5,0.635) 5(0,0.635) 6(-0.5,0.635)
  body extent -0.8,-0.81 0.8,0.81, height 0.6
SOT-23-5 [mm] "TI SOT-23-5"
  rrect16% 1.1x0.6 smd: 1(-1.3,0.95) 2(-1.3,0) 3(-1.3,-0.95) 4(1.3,-0.95) 5(1.3,0.95)
  silkscreen extent -1.52,1.52 -1.02,1.78, body extent -1.4,-1.45 1.4,1.45, height 1.2
SOT-23-6 [mm] "TI SOT-23-6"
  rrect16% 1.1x0.6 smd: 1(-1.3,0.95) 2(-1.3,0) 3(-1.3,-0.95) 4(1.3,-0.95) 5(1.3,0) 6(1.3,0.95)
  silkscreen extent -1.52,1.52 -1.02,1.78, body extent -1.4,-1.45 1.4,1.45, height 1.45
SW_DIP_SPSTx04_Slide [mm] "SMD 4x-dip-switch SPST P1.27mm"
  rrect50% 1.6x0.76 smd: 1(-2.54,1.905) 2(-2.54,0.635) 3(-2.54,-0.635) 4(-2.54,-1.905) 5(2.54,-1.905) 6(2.54,-0.635) 7(2.54,0.635) 8(2.54,1.905)
  silkscreen extent -3.34,-3.23 2.76,3.23, body extent -2.8,-3.16 2.8,3.16, height 2.65
TDFN-8-2x2mm_P0.5mm [mm]
  rrect50% 1.05x0.3 smd: 1(-0.85,0.75)
  rrect50% 0.95x0.3 smd: 2(-0.9,0.25) 3(-0.9,-0.25) 4(-0.9,-0.75) 5(0.9,-0.75) 6(0.9,-0.25) 7(0.9,0.25) 8(0.9,0.75)
  silkscreen extent -1.04,1.21 -0.76,1.4, body extent -1,-1 1,1, height 0.75
TP_0.50mm [mm] "Testpoint 0.50mm diameter"
  round 0.5 smd paste-1: TP(0,0)
  body extent -0.2,-0.2 0.2,0.2, height 0.1
TPESD05R4C6 [mm]
  rect 0.4x0.85 smd: 1(-0.65,-0.925) 2(0,-0.925) 3(0.65,-0.925) 4(0.65,0.925) 5(0,0.925) 6(-0.65,0.925)
  silkscreen extent -1.4,-1.27 -1.14,-0.76, body extent -1,-1.05 1,1.05, height 1.1
TPS259531 [mm]
  rrect40% 0.5x0.25 smd: 1(-0.95,0.75) 2(-0.95,0.25) 3(-0.95,-0.25) 4(-0.95,-0.75) 5(0.95,-0.75) 6(0.95,-0.25) 7(0.95,0.25) 8(0.95,0.75)
  rrect11% 0.9x1.6 smd: 9(0,0)
  silkscreen extent -1.65,0.51 -1.4,1.02, body extent -1,-1 1,1, height 0.77
TSOP65P640X120-24N [mm] "TSOP, 24-Leads, Body 7.80x4.40mm, Pitch 0.65mm, IPC Medium Density"
  rrect22% 1.5x0.45 smd: 1(-2.95,3.575) 2(-2.95,2.925) 3(-2.95,2.275) 4(-2.95,1.625) 5(-2.95,0.975) 6(-2.95,0.325) 7(-2.95,-0.325) 8(-2.95,-0.975) 9(-2.95,-1.625) 10(-2.95,-2.275) 11(-2.95,-2.925) 12(-2.95,-3.575) 13(2.95,-3.575) 14(2.95,-2.925) 15(2.95,-2.275) 16(2.95,-1.625) 17(2.95,-0.975) 18(2.95,-0.325) 19(2.95,0.325) 20(2.95,0.975) 21(2.95,1.625) 22(2.95,2.275) 23(2.95,2.925) 24(2.95,3.575)
  silkscreen extent -3.05,-3.95 1.85,4.44, body extent -3.2,-3.9 3.2,3.9, height 1.13
UQFN-16_1.8x2.6mm_P0.4mm [mm] "UQFN, 16 Pin (https://www.ti.com/lit/ml/qfnd836/qfnd836.pdf)"
  rrect50% 0.9x0.2 smd: 1(-0.8,0.6)
  rrect50% 0.8x0.2 smd: 2(-0.85,0.2) 3(-0.85,-0.2) 4(-0.85,-0.6) 9(0.85,-0.6) 10(0.85,-0.2) 11(0.85,0.2) 12(0.85,0.6)
  rrect50% 0.2x0.8 smd: 5(-0.6,-1.25) 6(-0.2,-1.25) 7(0.2,-1.25) 8(0.6,-1.25) 13(0.6,1.25) 14(0.2,1.25) 15(-0.2,1.25) 16(-0.6,1.25)
  silkscreen extent -1.3,-1.41 1.01,1.41, body extent -0.9,-1.3 0.9,1.3, height 0.55
USB_A_CUI_UJ2-ADH-TH_Horizontal_Stacked [mm] "USB-A two stacked horizontal receptacle, through-hole (https://www.cuidevices.com/product/resource/uj2-adh-th.pdf)"
  rrect33% 1.5x1.5 hole 0.92: 1(0,0)
  round 1.5 hole 0.92: 2(0,-2.5) 3(0,-4.5) 4(0,-7) 5(2.62,0) 6(2.62,-2.5) 7(2.62,-4.5) 8(2.62,-7)
  round 3.5 hole 2.3: SH(-2.71,3.07) SH(-2.71,-10.07) SH(2.97,3.07) SH(2.97,-10.07)
  silkscreen extent -11.58,-10.13 4.07,3.75, body extent -13.03,-11.58 4.06,4.47, height 16.18
USB_C_Receptacle_GCT_USB4105-xx-A_16P_TopMnt_Horizontal [mm] "USB 2.0 Type C Receptacle, GCT, 16P, top mounted, horizontal, 5A: https://gct.co/files/drawings/usb4105.pdf"
  rrect50% 0.6x1.15 smd: A1(-3.2,3.68) A4(-2.4,3.68) A9(2.4,3.68) A12(3.2,3.68) B1(3.2,3.68) B4(2.4,3.68) B9(-2.4,3.68) B12(-3.2,3.68)
  rrect50% 0.3x1.15 smd: A5(-1.25,3.68) A6(-0.25,3.68) A7(0.25,3.68) A8(1.25,3.68) B5(1.75,3.68) B6(0.75,3.68) B7(-0.75,3.68) B8(-1.75,3.68)
  oval 1x1.8 hole 0.6 slot 1.4 at 90 deg: S1(-4.32,-1.075) S1(4.32,-1.075)
  oval 1x2.1 hole 0.6 slot 1.7 at 90 deg: S1(-4.32,3.105) S1(4.32,3.105)
  round 0.65 hole 0.65 unplated: ""(-2.89,2.605) ""(2.89,2.605)
  silkscreen extent -4.67,0.1 4.67,1.8, body extent -4.47,-3.52 4.47,4.19, height 3.32
VQFN-32-1EP_5X5MM_P0.5MM_EP3.5X3.5MM [mm] "VQFN, 32 Pin (https://www.ftdichip.com/Support/Documents/DataSheets/ICs/DS_FT4222H.pdf#page=40)"
  rrect50% 0.8x0.25 smd: 1(-2.45,1.75) 2(-2.45,1.25) 3(-2.45,0.75) 4(-2.45,0.25) 5(-2.45,-0.25) 6(-2.45,-0.75) 7(-2.45,-1.25) 8(-2.45,-1.75) 17(2.45,-1.75) 18(2.45,-1.25) 19(2.45,-0.75) 20(2.45,-0.25) 21(2.45,0.25) 22(2.45,0.75) 23(2.45,1.25) 24(2.45,1.75)
  rrect50% 0.25x0.8 smd: 9(-1.75,-2.45) 10(-1.25,-2.45) 11(-0.75,-2.45) 12(-0.25,-2.45) 13(0.25,-2.45) 14(0.75,-2.45) 15(1.25,-2.45) 16(1.75,-2.45) 25(1.75,2.45) 26(1.25,2.45) 27(0.75,2.45) 28(0.25,2.45) 29(-0.25,2.45) 30(-0.75,2.45) 31(-1.25,2.45) 32(-1.75,2.45)
  rect 3.5x3.5 smd paste-1.75: 33(0,0)
  silkscreen extent -3.44,-2.61 2.61,2.61, body extent -2.5,-2.5 2.5,2.5, height 0.8

## Part data
AE1: "Ceramic chip antenna with pin for PCB trace"
C1 C2 C3 C4 C7 C8 C9 C10 C11 C12 C13 C16 C18 C42 C45 C49 C50 C83 C86 C88 C90 C101 C112 C119 C124 C131 C141 C143 C144 C147 C150 C153 C156 C157 C177 C180 C183 C186 C192 C193 C202 C215 C222 C224 C238 C240 C242 C243 C246 C250 C257 C258 C259 C261 C263 C266 C267: library part C_0402, "MLCC 0402"
C14 C15 C17 C19 C20 C21 C22 C25 C26 C27 C29 C30 C31 C32 C34 C36 C37 C38 C39 C40 C41 C43 C44 C46 C47 C48 C51 C52 C53 C54 C82 C84 C85 C87 C89 C91 C92 C93 C94 C95 C96 C97 C98 C99 C100 C102 C103 C104 C105 C106 C107 C108 C109 C110 C111 C113 C114 C115 C116 C117 C118 C120 C121 C122 C123 C125 C126 C127 C128 C129 C130 C132 C133 C134 C135 C136 C137 C138 C139 C140 C142 C145 C146 C148 C149 C151 C152 C154 C155 C158 C159 C160 C161 C162 C163 C164 C165 C166 C167 C168 C169 C170 C171 C172 C173 C174 C175 C176 C178 C179 C181 C182 C184 C185 C187 C188 C189 C190 C191 C194 C195 C196 C197 C198 C199 C200 C201 C203 C204 C205 C206 C207 C208 C209 C210 C211 C212 C213 C214 C216 C217 C218 C219 C220 C221 C223 C225 C226 C227 C228 C229 C230 C231 C232 C233 C234 C235 C236 C237 C239 C241 C244 C245 C247 C248 C249 C251 C252 C253 C254 C255 C256: "MLCC 0201"
C23 C24 C28 C33 C35 C55 C56 C59 C62 C67 C69 C71 C72 C73 C74 C75 C76 C77 C78 C79 C80 C81 C264 C265 C268: "MLCC 0402"
D1 D2: "Diode, filled shape", Sim.Device=D, Sim.Pins="1=K 2=A"
D3 D4 D5 D6 D7 D8: "Diode, filled shape", Manufacturer Part Number=BAT54TS_R1_00001, Manufacturer_Name="Panjit International Inc."
D9 D10: library part D_Zener, "Diode, filled shape", Manufacturer Part Number=BAT54TS_R1_00001, Manufacturer_Name="Panjit International Inc."
ESD1 ESD2: "ESD and Surge Protection (TVS/ESD) 1.3pF 5V 5uA 6.5A@8/20us 9V 9V Four channels SOT-363  ROHS", Manufacturer_Name="TECH PUBLIC", Manufacturer_Part_Number=TPESD05R4C6
ESD3: "HDMI TSSOP-24 Interface 3.4Gbps 4.5V~5.5V I2C", Manufacturer_Name="Texas Instrument", Manufacturer_Part_Number=TPD12S016PWR
ESD4 ESD5 ESD8: library part D_ESDU, "ESD diode uni-directional", Manufacturer Part Number=DF2S8.2FS,L3M, Manufacturer_Name=TOSHIBA
ESD6 ESD7 ESD9 ESD10 ESD11 ESD12: library part D_ESDB, "ESD diode bi-directional", Manufacturer Part Number=ESD341DPLR, Manufacturer_Name="TECH PUBLIC"
FB3 FB4 FB5 FB6 FB7 FB8 FB9 FB10 FB11 FB12 FB13 FB14 FB15 FB16: "Ferrite bead"
J4: library part PJ-342, "3.5mm Headphone Jack 30V 500mA Copper Gold SMD Audio Connectors ROHS", Manufacturer_Name="SHOU HAN", Manufacturer_Part_Number=PJ-342
J6: "1 port RJ45 MagJack GIGABIT Right Angle Shielded With Contact Spring With LED", Manufacturer_Name="HANRUN(Zhongshan HanRun Elec)", Manufacturer_Part_Number=HR915350C, Height=13.55
J7: "SWG Connector Receptacle, Female Socket 50 Ohms Surface Mount Solder"
J8: "Micro SD Card Socket with one card detection pin", Manufacturer_Name=CUI, ComponentLink1Description=Datasheet, ComponentLink1URL=https://datasheet.lcsc.com/lcsc/2110151630_XKB-Connectivity-XKTF-015-N_C381082.pdf, Manufacturer_Part_Number=MSD-1-A
J10: "HDMI 1.4+ type D connector", ComponentLink1Description=Datasheet, ComponentLink1URL=http://pinoutguide.com/PortableDevices/micro_hdmi_type_d_pinout.shtml, Datasheet=http://pinoutguide.com/PortableDevices/micro_hdmi_type_d_pinout.shtml
J11: "Generic connector, single row, 01x22, script generated (kicad-library-utils/schlib/autogen/connector/)"
J12: "USB 2.0-only 16P Type-C Receptacle connector", Manufacturer_Name=GCT, Manufacturer_Part_Number=USB4105-GF-A, ComponentLink1Description=Datasheet, ComponentLink1URL=https://www.usb.org/sites/default/files/documents/usb_type-c.zip, Datasheet=https://www.usb.org/sites/default/files/documents/usb_type-c.zip
J13: "USB Type A connector, stacked", Manufacturer_Name="SHOU HAN", Manufacturer_Part_Number="AF SS-JB17.6"
L6 L7: library part L_0201, "Inductor"
R1 R2 R3 R4 R5 R6 R7 R8 R9 R10 R11 R12 R13 R14 R15 R16 R17 R18 R19 R20 R21 R22 R23 R24 R25 R26 R27 R28 R29 R30 R31 R32 R33 R34 R35 R36 R37 R38 R39 R40 R41 R42 R43 R44 R45 R46 R47 R48 R49 R50 R51 R52 R53 R54 R55 R56 R57 R58 R59 R63 R64 R65 R66 R67 R68 R69 R70 R78 R79 R80 R81 R82 R83 R84 R85 R86 R87 R88 R89 R90 R91 R92 R93 R94 R95 R96 R97 R98 R99 R100 R101 R102 R103 R104 R105 R106 R107 R108 R109 R110 R111 R112 R113 R114 R115 R116 R117 R118 R119 R120 R121 R122 R123 R124 R125 R126 R127 R128 R129 R130 R131 R132 R133 R134 R135 R136 R137 R138 R139 R140 R141 R142 R143 R144 R145 R146 R147 R148 R149 R150 R151 R152 R153 R154 R155 R156 R157 R158 R159 R160 R161 R162 R163 R164 R165 R166 R167 R168 R169 R170 R171 R172 R173 R174 R175 R176 R177 R178 R179 R180 R181 R182 R183 R184 R185 R186 R187 R188 R189 R191 R192 R193 R194 R196 R197 R198 R199 R200 R201 R202 R203 R204 R205 R206 R207 R208 R209 R210 R211 R212 R213 R214 R215: library part R_0201, Tolerance=1%
R60 R61 R62 R71 R72 R73 R74 R75 R76 R77 R190 R195: library part R_0402, Tolerance=1%
SW2: library part SW_DIP_4, Manufacturer_Name="CTS Electrocomponents", Manufacturer_Part_Number=218-4LPSTJR
U1: "Audio CODEC 24 b I2S, PCM", ComponentLink1Description=Datasheet, ComponentLink1URL=https://datasheetspdf.com/pdf-file/1134755/nuvoton/NAU88C22/1, Datasheet=https://datasheetspdf.com/pdf-file/1134755/nuvoton/NAU88C22/1
U2: "Hi Speed Quad Channel USB UART/FIFO, LQFP/QFN-64", ComponentLink1Description=Datasheet, ComponentLink1URL=https://www.ftdichip.com/Support/Documents/DataSheets/ICs/DS_FT4232H.pdf, Datasheet=https://www.ftdichip.com/Support/Documents/DataSheets/ICs/DS_FT4232H.pdf
U4: "Gigabit Ethernet Transceiver with RGMII Interface and IEEE 1588v2 Support, VQFN-48", ComponentLink1Description=Datasheet, ComponentLink1URL=https://ww1.microchip.com/downloads/aemDocuments/documents/UNG/ProductDocuments/DataSheets/LAN8840-Data-Sheet-DS00004727.pdf, Datasheet=https://ww1.microchip.com/downloads/aemDocuments/documents/UNG/ProductDocuments/DataSheets/LAN8840-Data-Sheet-DS00004727.pdf, KiCad_Footprint=Package_DFN_QFN:QFN-48-1EP_7x7mm_P0.5mm_EP5.15x5.15mm
U5: "Linear Voltage Regulator IC Positive Fixed 1 Output 300mA SOT-23-5", Manufacturer_Name="Texas Instruments", Manufacturer_Part_Number=TLV74311PDBVR
U6 U7: "Buck Switching Regulator IC Positive Adjustable 0.6V 1 Output 3A SOT-563", Manufacturer_Name="Diodes Incorporated", Manufacturer_Part_Number=AP61300Z6-7
U8: library part TPS6521901RSMR, "PMIC, 3 bucks + 4 LDOs, I2C, NVM 07, 4x4mm RHB VQFN-32 plus exposed PGND pad 33", ComponentLink1Description=Datasheet, ComponentLink1URL=https://www.ti.com/lit/ds/symlink/tps65219.pdf, Datasheet=https://www.ti.com/lit/ds/symlink/tps65219.pdf, Footprint_Note="Generic footprint candidate: 5x5mm, 0.5mm pitch, EP3.7mm. Exists locally; pad lengths differ from TI RHB0032W recommended land pattern. Review before PCB fabrication.", MPN=TPS6521901RSMR
U9: "Murata Type 2AE Wi-Fi 802.11a/b/g/n/ac + Bluetooth 5.2 combo module, Infineon CYW4373E, SDIO/USB host interface, 8.0x7.8mm LGA-77", ComponentLink1Description=Datasheet, ComponentLink1URL=https://www.murata.com/products/productdata/8816428220446/type2ae.pdf, Datasheet=https://www.murata.com/products/productdata/8816428220446/type2ae.pdf, KiCad_Footprint=RF_Module:Murata_LBEE5PK2AE-564
U10: "1G x 16-bit (16 Gbit) CMOS Double Data Rate IV Synchronous RAM, FBGA-96", ComponentLink1Description=Datasheet, ComponentLink1URL=https://www.alldatasheet.com/datasheet-pdf/pdf/1643784/SAMSUNG/K4AAG165WA-BCWE.html, Datasheet=https://www.alldatasheet.com/datasheet-pdf/pdf/1643784/SAMSUNG/K4AAG165WA-BCWE.html, KiCad_Footprint=Package_BGA:Samsung_FBGA-96_8x14mm_Layout9x16_P0.8mm
U11: "Samsung eMMC 5.1, 32GB, NAND flash + MMC controller, HS400 capable, FBGA-153", ComponentLink1Description=Datasheet, ComponentLink1URL=https://www.lcsc.com/datasheet/C2803245.pdf, Datasheet=https://www.lcsc.com/datasheet/C2803245.pdf, KiCad_Footprint=Package_BGA:Samsung_FBGA-153_11.5x13mm_Layout14x14_P0.5mm
U12: "128Mbit 1.65V~1.95V 133MHz SPI TFBGA-24(6x8) Memory RoHS"
U13 U14 U15 U16: "4-Bit Dual-Supply Bus Transceiver With Configurable Voltage Translation and 3-State Outputs, 16-UQFN (2.6x1.8)", Manufacturer_Name="Texas Instruments", Datasheet=https://www.ti.com/lit/ds/symlink/sn74axc4t774.pdf?HQS=dis-dk-null-digikeymode-dsf-pf-null-wwe&ts=1791191909639&ref_url=https%253A%252F%252Fwww.ti.com%252Fgeneral%252Fdocs%252Fsuppproductinfo.tsp%253FdistId%253D10%2526gotoUrl%253Dhttps%253A%252F%252Fwww.ti.com%252Flit%252Fgpn%252Fsn74axc4t774, Manufacturer_Part_Number=SN74AXC4T774RSVR
U17: "Load Switch -40℃~+105℃ 1 1V~5.5V 2A 53mΩ Active High SOT-23-6 Power Distribution Switches ROHS", Manufacturer_Name="Texas Instruments", Manufacturer_Part_Number=TPS22918DBVR
U18: "TI AM6254, quad Cortex-A53 SoC, ALW 425-ball FCCSP 13x13mm 0.5mm pitch; separate interface and power units", ComponentLink1Description=Datasheet, ComponentLink1URL=https://www.ti.com/lit/ds/symlink/am625.pdf, Datasheet=https://www.ti.com/lit/ds/symlink/am625.pdf, Footprint_Note="Unassigned: requires verified ALW0425 425-ball FCCSP, 13x13mm, 0.5mm pitch; do not substitute a fully populated BGA.", KiCad_Footprint=SamacSys_Parts:BGA425C50P25X25_1300X1300X89, MPN=AM6254ATCGHAALW, Pinmux_Note="Each physical ball occurs once under its primary interface. See companion pinmux CSV for alternate functions. Multiplexable digital pads use bidirectional ERC type."
U19: "Clock Clock Buffer IC 1:4 250 MHz 8-WFDFN Exposed Pad"
U20: "HDMI 1.4 transmitter with 24-bit parallel video", Manufacturer_Name=Lattice, Manufacturer_Part_Number=SiI9022ACNU
U21 U22: "Linear Voltage Regulator IC Positive Fixed 1 Output 300mA SOT-25", Manufacturer_Name="Diodes Incorporated", Manufacturer_Part_Number=AP2151WG-7
U23: "E-Fuse 34mΩ Integrated FET Surface Mount WSON-8-EP(2x2)", Manufacturer_Name="Texas Instruments", Manufacturer_Part_Number=TPS259531DSGR
Y2: "25 MHz XO (Standard) HCMOS Oscillator 1.6V ~ 3.6V Enable/Disable 4-SMD, No Lead", Manufacturer_Name=ECS, Manufacturer_Part_Number=ECS-2520MV-250-CN-TR

## Free pads (board coordinates)
  round 0 hole 2.7 unplated: 5(3.5,3.5) 5(81.5,3.5) 5(81.5,52.5)
  round 0 hole 3 unplated: 5(3.5,52.5)

## Via types
v1: diameter 0.35, hole 0.2, L1(SIG) to L8(SIG), 222 vias
v2: diameter 0.45, hole 0.2, L1(SIG) to L8(SIG), 7 vias

## Nets (pads, with @x,y where several pads share a name; then routed paths per layer and width w, separated by ;. In a path a pad name is that pad's centre, name@x,y a point inside that pad or via, vN(x,y) a via of type N, cw(c..) or ccw(c..) an arc to the next point about the centre after c; other vN are vias at no path point)
1V8_REG_EN: R65.1 TP25.TP U7.5 U8.8
1V8_REG_FB: R68.1 R70.2 TP11.TP U7.1
1V8_REG_INJ-: R66.2 R68.2 TP12.TP
1V8_REG_SW: U7.4
1V8_REG_VOUT: R62.1 R66.1 TP8.TP U7.6
3V3_REG_EN: R63.1 U6.5
3V3_REG_FB: R67.1 R69.2 TP9.TP U6.1
3V3_REG_INJ-: R64.2 R67.2 TP10.TP
3V3_REG_SW: U6.4
3V3_REG_VOUT: R61.1 R64.1 TP7.TP U6.6
+1V1_LDO: C46.1 C47.1 C48.1 C49.1 FB4.2 U4.4 U4.9 U4.47 U5.1
+1V2_DRAM: C89.2 C90.1 C91.1 C92.1 C93.1 C94.1 C95.1 C96.1 C97.1 C98.1 C99.1 C100.1 C101.1 C102.1 C103.1 C104.1 C105.1 C106.1 C107.1 C108.1 C109.1 C110.1 C111.1 C115.1 R99.1 R100.1 R101.1 R106.1 U10.A1 U10.A9 U10.B3 U10.B9 U10.C1 U10.D1 U10.D9 U10.F2 U10.F8 U10.G1 U10.G7 U10.G9 U10.J1 U10.J2 U10.J8 U10.J9 U10.L1 U10.L9 U10.R1 U10.T9 | length 8.7
  L1(SIG) w0.076: v1(33.452,16.561) 33.452,16.555 33.8,16.206 U10.B9@33.8,16.2 ; v1(36.627,10.973) U10.F2@37,10.6 ; v1(37.783,13.945) 37.791,13.953 37.791,14.591 U10.G7@37.8,14.6 ; U10.G9@37.796,16.196 U10.G9@37.8,16.2 37.8,16.756 v1(37.804,16.76) ; U10.J1@39.396,9.804 U10.J1@39.4,9.8 39.4,9.305 v1(39.404,9.301) ; U10.L1@40.996,9.804 U10.L1@41,9.8 41,9.305 v1(41.004,9.301) ; U10.R1@44.196,9.804 U10.R1@44.2,9.8 44.2,9.305 v1(44.204,9.301)
  L1(SIG) w0.12: v1(32.615,9.413) v1(32.615,9.413) U10.A1@33,9.8 U10.A1@33,9.802 ; v1(33.415,11.013) v1(33.415,11.013) U10.B3@33.8,11.4 U10.B3@33.8,11.402 ; v1(34.215,9.413) v1(34.215,9.413) U10.C1@34.6,9.8 U10.C1@34.6,9.802 ; v1(35.015,9.413) v1(35.015,9.413) U10.D1@35.4,9.8 U10.D1@35.4,9.802 ; v1(36.615,15.013) 36.615,15.015 U10.F8@37,15.4 U10.F8@37,15.4 ; v1(38.989,14.961) 38.989,14.975 39.4,15.386 U10.J8@39.4,15.4 ; v1(39.015,15.813) 39.015,15.815 U10.J9@39.4,16.2 U10.J9@39.4,16.2 ; v1(40.998,16.747) v1(40.998,16.747) 40.999,16.201 U10.L9@41,16.2
  L1(SIG) w0.3: v1(44.996,16.637) 44.998,16.635 44.998,16.202 U10.T9@45,16.2
+1V2_HDMI: C242.1 C250.1 FB14.1 FB16.1
+1V2_PMIC: C215.1 C216.1 C217.1 C218.1 C219.1 C220.1 R73.2 U18.K9 U18.L8 U18.M9 U18.P9 U18.R8 | length 0.3
  L1(SIG) w0.076: U18.L8@42,28.5 42.007,28.507 42.007,28.833 v1(42.013,28.84)
+1V8_CLK: C238.1 C239.1 C240.1 C241.1 U19.6 Y2.4
+1V8_CODEC: C13.1 C14.1 C15.1 U1.13 U1.14
+1V8_EMMC: C124.1 C125.1 C126.1 C127.1 C128.1 C129.1 C131.1 C132.1 R108.1 R109.1 R110.1 R111.1 R112.1 R113.1 R114.1 R115.1 R116.1 R117.1 R121.1 R122.1 R123.1 R124.1 R125.1 R126.1 U11.C6 U11.M4 U11.N4 U11.P3 U11.P5 U12.B4
+1V8_ETH: C37.1 C38.1 C39.1 C40.1 C41.1 C42.1 R19.1 R20.1 R21.1 R22.1 R23.1 R24.1 R25.1 R26.1 R27.1 R47.1 R48.1 R49.1 R50.1 R51.1 R52.1 U4.17 U4.24 U4.28 U4.35 U4.41
+1V8_FTDI: C134.1 C136.1 C138.1 C140.1 U13.16 U14.16 U15.16 U16.16
+1V8_HDMI: C246.1 FB15.1 R165.1 R166.1 R167.1 R177.1
+1V8_LDO: C187.1 C188.1 C189.1 FB7.2 FB8.2 FB9.2 FB10.2 FB11.2 FB12.2 FB13.2 R76.2 U18.G7 U18.G16 U18.T9 | length 1.5
  L1(SIG) w0.076: U18.G7@40,28 40.003,27.998 40.003,27.46 v1(40.005,27.457) ; U18.G16@40,32.5 40.003,32.497 40.003,32.032 v1(40.005,32.029) ; v1(44.12,29.235) 44.218,29.235 44.453,29 U18.T9@44.5,29
+1V8_REG: C62.1 C74.1 C202.1 C203.1 C204.1 C205.1 C206.1 C207.1 C208.1 C209.1 C210.1 C211.1 C212.1 C213.1 C214.1 R62.2 R147.1 R148.1 R149.1 R150.1 R151.1 R152.1 R153.1 R154.1 R196.1 R197.1 R198.1 R199.1 R200.1 R201.1 R202.1 R203.1 TP18.TP U8.20 U18.F15 U18.G10 U18.G14 U18.G17 U18.L18 U18.M19 U18.N18 U18.P18 U18.T7 U18.T19 U18.U18 U18.W16 U18.W19 | length 3.8
  L1(SIG) w0.076: v1(39.522,32.944) 39.551,32.972 39.972,32.972 U18.G17@40,33 ; v1(39.548,31.496) 39.55,31.498 39.998,31.498 U18.G14@40,31.5 ; v1(39.599,29.591) 39.673,29.591 39.761,29.503 39.936,29.503 39.967,29.533 U18.G10@40,29.5 ; v1(42.062,33.96) 42.082,33.98 42.48,33.98 U18.M19@42.5,34 ; U18.T7@44.5,28 44.5,27.964 44.651,27.813 44.651,27.411 v1(44.627,27.387) ; U18.T19@44.5,34 44.533,34.033 44.533,34.322 v1(44.599,34.389) ; v1(45.999,33.604) U18.W19@46,34 ; U18.W16@46,32.5 46.007,32.493 46.45,32.493 v1(46.457,32.487)
+1V8_WB: C86.1 C87.1 R83.1 R84.1 R85.1 R86.1 R87.1 R91.1 R92.1 R93.1 U9.42
+2V5_DRAM: C112.1 C113.1 C114.1 R77.2 U10.B1 U10.R9 | length 1
  L1(SIG) w0.12: v1(33.415,9.413) v1(33.415,9.413) U10.B1@33.8,9.8 U10.B1@33.8,9.802
  L1(SIG) w0.35: v1(44.196,16.637) 44.198,16.635 44.198,16.202 U10.R9@44.2,16.2
+3V3_CAM: J11.22
+3V3_CODEC: C16.1 C17.1 C18.1 C19.1 U1.26 U1.31
+3V3_EMMC: C119.1 C120.1 C121.1 C122.1 C123.1 U11.E6 U11.F5 U11.J10 U11.K9
+3V3_ETH: C50.1 FB3.2 U5.5
+3V3_FTDI: C20.1 C23.1 C28.1 C29.1 C30.1 C31.1 C32.1 C59.1 C133.1 C135.1 C137.1 C139.1 FB1.1 FB2.1 R11.1 R15.1 R61.2 U2.20 U2.31 U2.42 U2.50 U2.56 U13.1 U13.6 U13.15 U14.1 U14.5 U14.15 U15.1 U15.5 U15.15 U16.1 U16.5 U16.15